# Altium PCB ArmBand-Sensor-Board.PcbDoc
Units mil, origin at the board's own origin, x right, y up, seen from the top; angles counter-clockwise.
Board outline 1181.1 x 984.25 mil, 2 copper layers (Top Layer, Bottom Layer), stack 34 mil thick; 26 components, 22 nets, 118 pads, 68 vias.
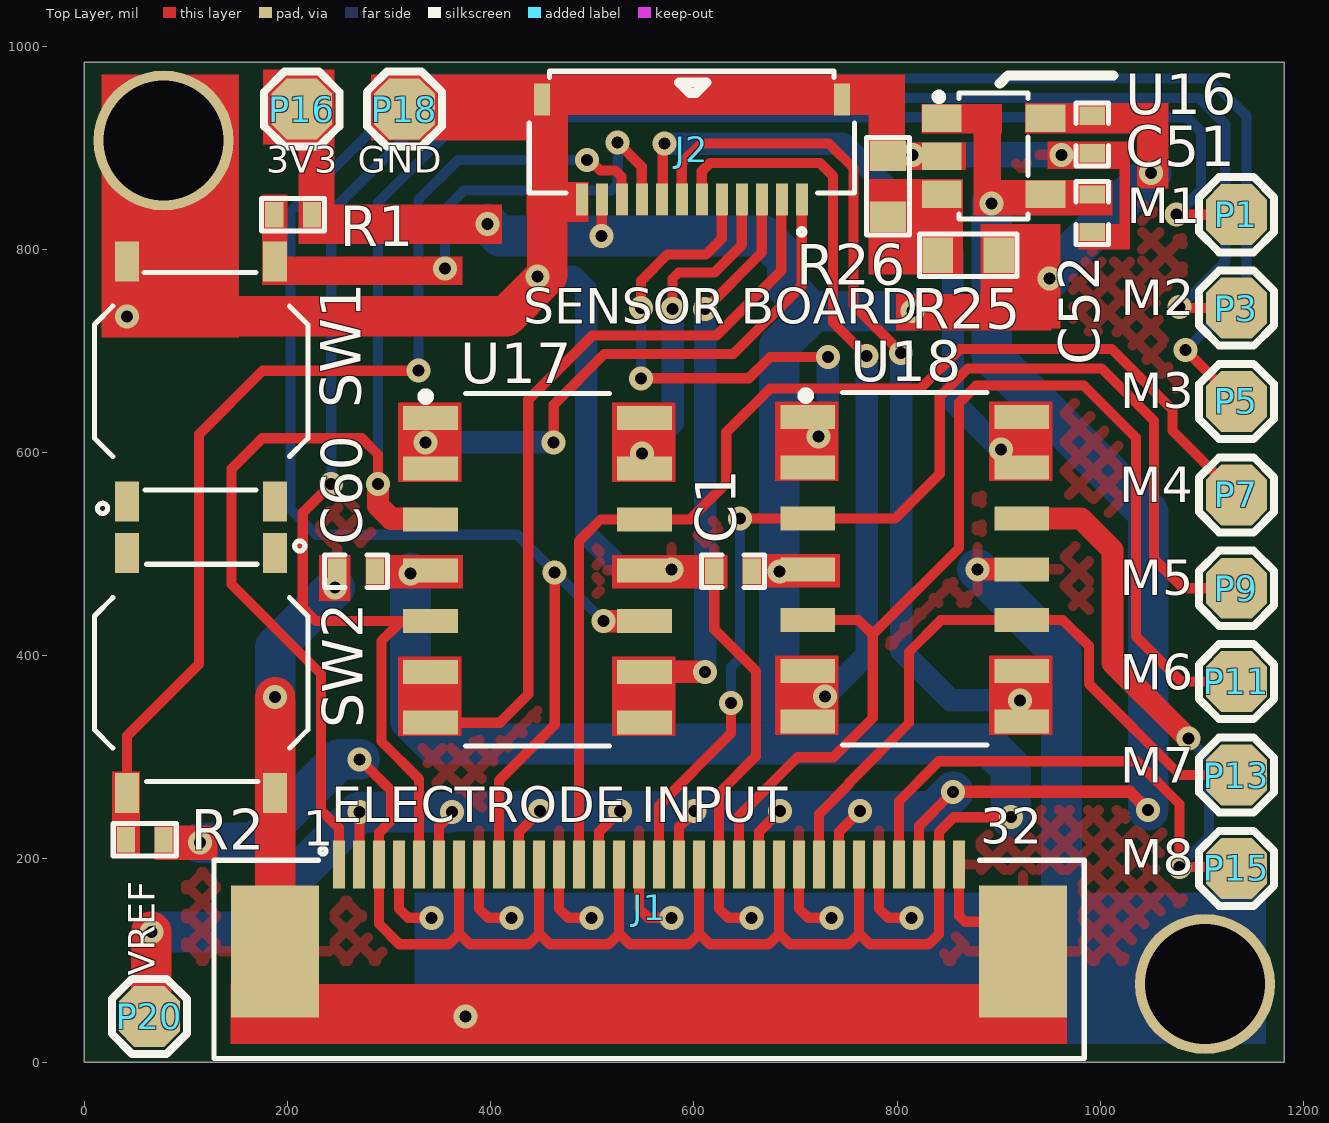
[diagram p0: Top Layer view]
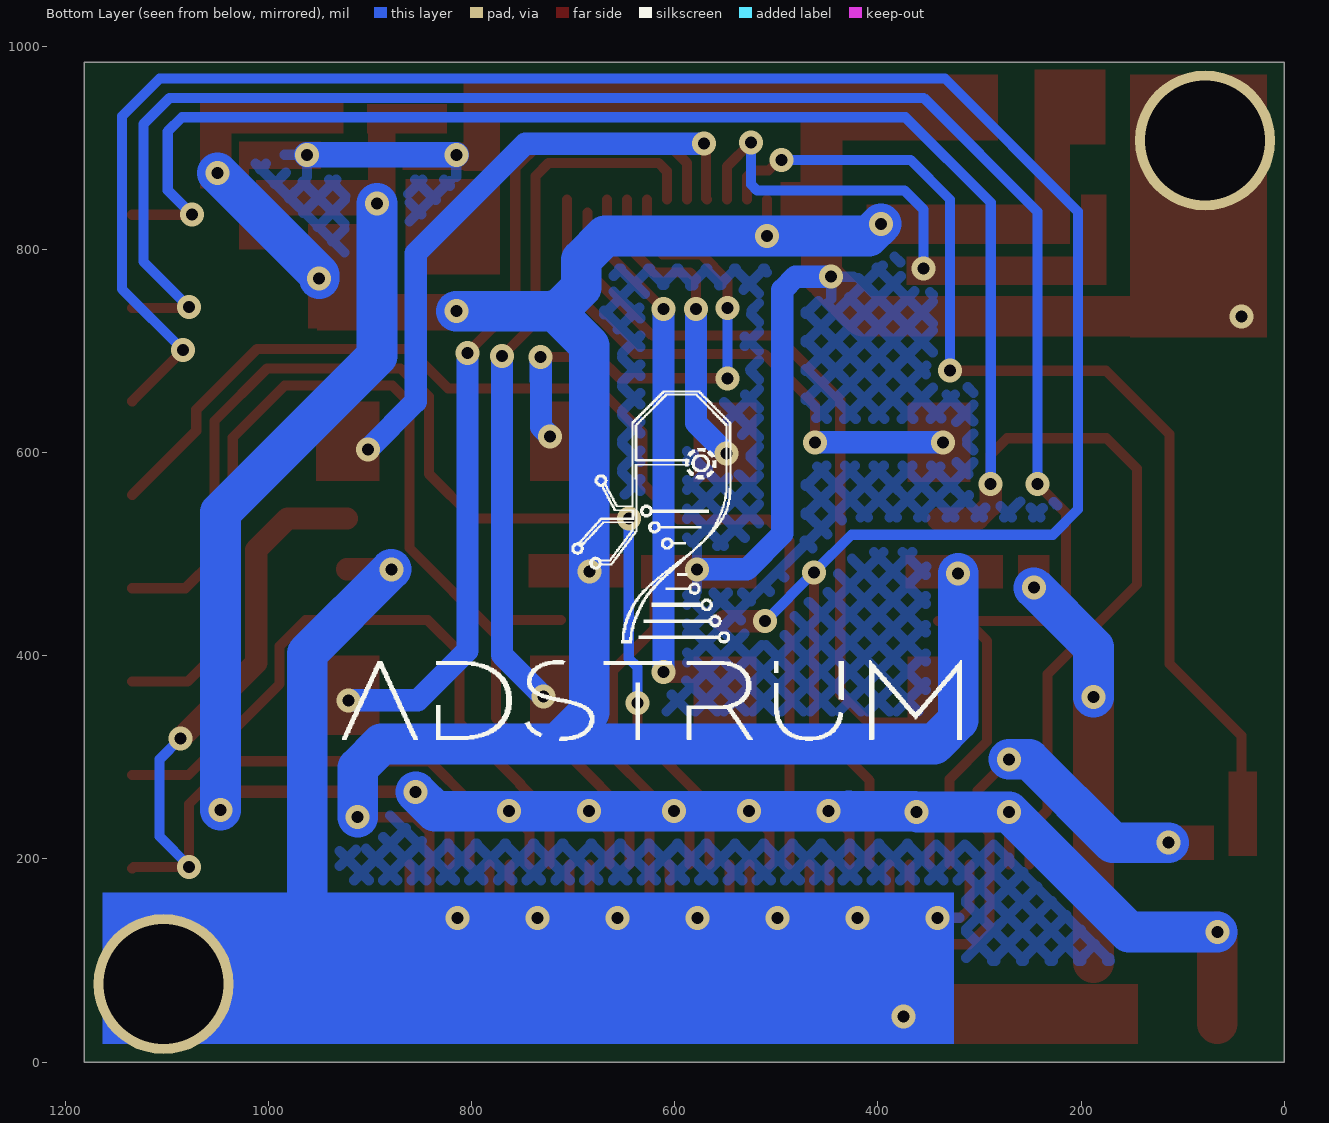
[diagram p1: Bottom Layer view, seen from below]
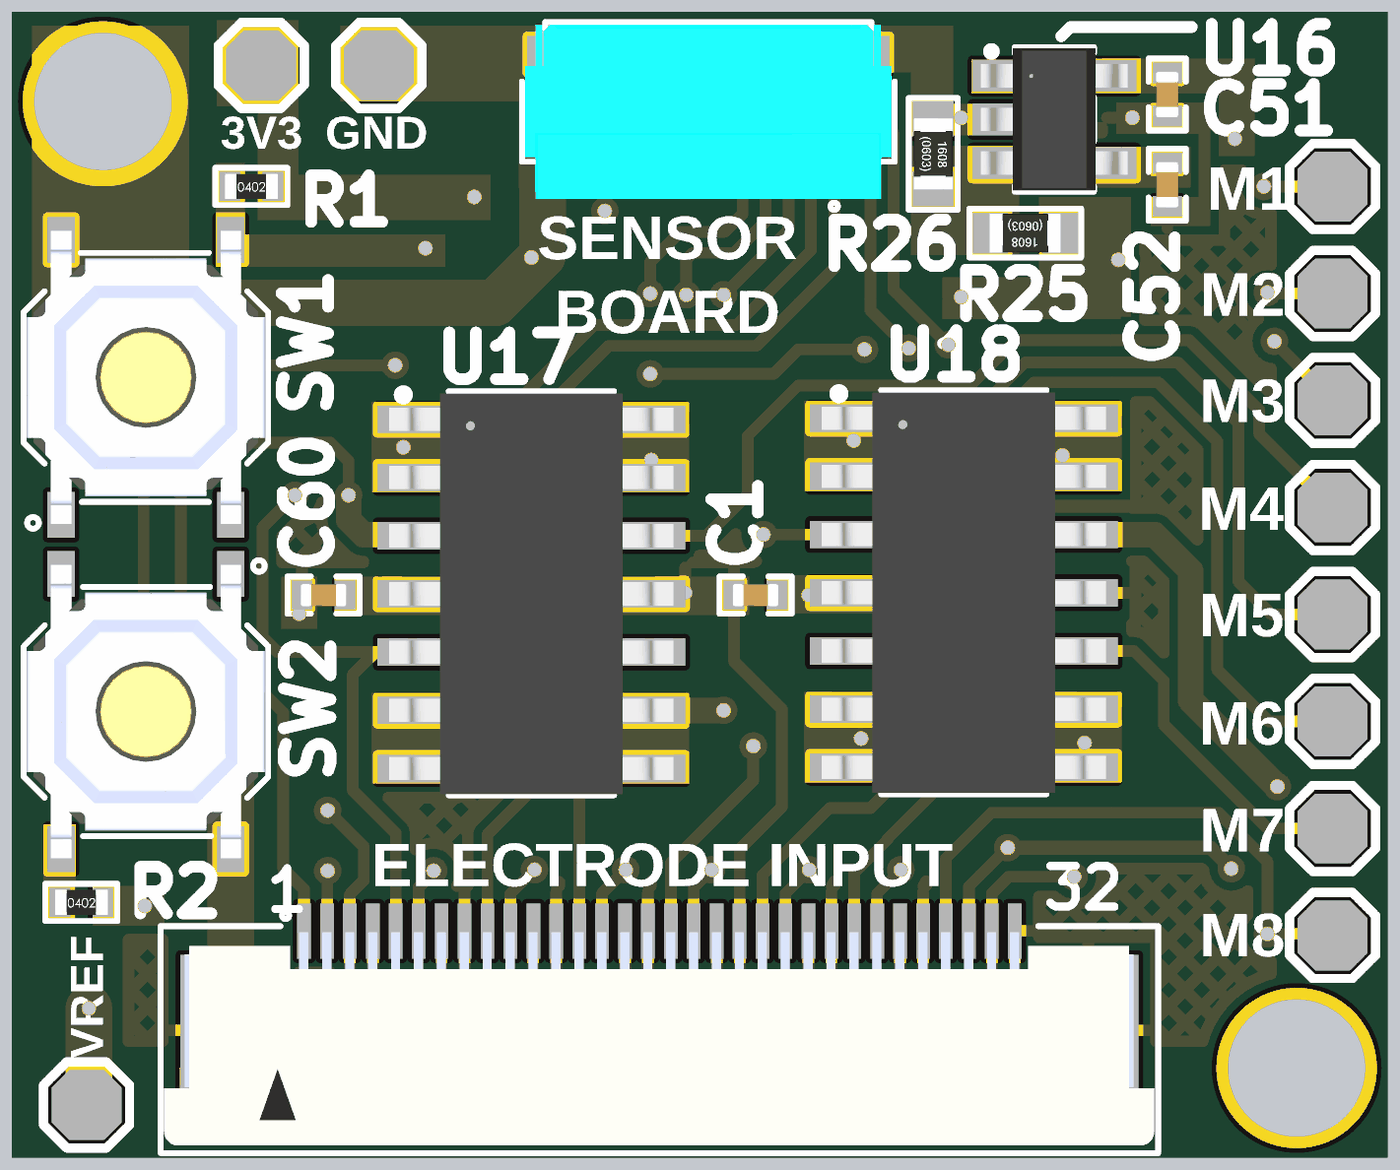
[diagram p2: 3D render of the assembled board from above, using the file's embedded part models]

## Layer stack, top to bottom
Top Solder: solder mask 3, Solder Resist, Dk 3.5
Top Layer: signal copper 9
Dielectric 1: dielectric 16, FR-4, Dk 4.8
Bottom Layer: signal copper 9
Bottom Solder: solder mask 3, Solder Resist, Dk 3.5

## Board outline
0,-0.25 1181.1,-0.25 1181.1,984 0,984

## Design rules (kind name [scope] priority, off if disabled: settings)
Clearance [All] p1: gap=7 ignorepadtopadclearanceinfootprint=FALSE except(0: Arc-Hole Track-Hole SMDPad-Hole THPad-Hole Via-Hole Fill-Hole Poly-Hole Region-Hole Text-Hole; 4: Arc-SMDPad Track-SMDPad SMDPad-SMDPad)
HoleSize [All] p1: absolutevalues=TRUE maxlimit=1000 minlimit=1 maxpercent=80.000 minpercent=20.000
HoleToHoleClearance [All] p1: gap=0 allowstackedmicrovias=TRUE
MinimumSolderMaskSliver [All] p1: minsoldermaskwidth=0
PolygonConnect [All] p1: connectstyle=Relief reliefconductorwidth=10 reliefentries=4 polygonreliefangle="90 Angle" airgapwidth=10
RoutingVias [All] p1: holewidth=11.81 width=23.62 viastyle="Through Hole" minholewidth=11.81 minwidth=23.62 maxholewidth=11.81 maxwidth=23.62
SilkToSilkClearance [All] p1: silktosilkclearance=0
SilkToSolderMaskClearance [IsPad] p1: minsilkscreentomaskgap=0 clearancetoexposedcopper=TRUE
SolderMaskExpansion [All] p1: expansion=4 istentingtop=FALSE
Width [All] p1: maxlimit=40 minlimit=10 preferedwidth=22
25 further rules are at their usual default settings.

## Classes and differential pairs
component class U_Opamp-Sheet2: C1 C51 C52 C60 R25 R26 U16 U17 U18
component class U_Connector-Sheet: J1 J2 P1 P3 P5 P7 P9 P11 P13 P15 P16 P18 P20 R1 R2 SW1 SW2

## Components (designator, comment, footprint, x,y, rotation, side; value= is the part's Value field where it differs from the comment)
C1 "0.1uF" "Cap 0402" 638.5,483 r180 top
C51 "1uF" "Cap 0402" 992,913 r270 top
C52 "1uF" "Cap 0402" 992,835.5 r270 top
C60 "0.1uF" "Cap 0402" 267.5,483 r180 top
J1 "AFC07-S32FCA-00" AFC07-S32FCA-00 555.89,151.72 r0 top
J2 "FH34SRJ-12S-0.5SH(50)" FH34SRJ-12S-0.5SH(50) 597.9,898.21 r180 top locked
P1 "Test Point" "TEST POINT" 1134,834 r0 top
P3 "Test Point" "TEST POINT" 1134,742.09 r0 top
P5 "Test Point" "TEST POINT" 1134,650.17 r0 top
P7 "Test Point" "TEST POINT" 1134,558.26 r0 top
P9 "Test Point" "TEST POINT" 1134,466.34 r0 top
P11 "Test Point" "TEST POINT" 1134,374.43 r0 top
P13 "Test Point" "TEST POINT" 1134,282.51 r0 top
P15 "Test Point" "TEST POINT" 1134,190.6 r0 top
P16 "Test Point" "TEST POINT" 214,938 r90 top
P18 "Test Point" "TEST POINT" 315,938 r180 top
P20 "Test Point" "TEST POINT" 64,45 r0 top
R1 "10K" Res0402 205.5,834 r0 top
R2 "10K" Res0402 59.5,219 r0 top
R25 "64K" Res0603 870,794 r0 top
R26 "64K" Res0603 791,862 r90 top
SW1 "TC-0522C-1.7-260G" TC-0522C-1.7-260G 115,670 r90 top value=-
SW2 "TC-0522C-1.7-260G" TC-0522C-1.7-260G 115,383 r270 top value=-
U16 "TPMCP6021T-E/OT" SOT-23-5 895.02,891.6 r0 top
U17 "LM324DT" SO-14 446,484 r0 top
U18 "LM324DT" SO-14 817.31,485 r0 top

## Footprints (in the part's own frame and the unit in brackets; to place one, negate y for a bottom-side part, rotate by r counter-clockwise, add the part's x,y. Pads: shape width x height; smd on the part's side, far side on the other; paste and mask are expansions set on the pad)
AFC07-S32FCA-00 [mm]
  rect 0.3x1.2 smd: 1(-7.75,1.085) 2(-7.25,1.085) 3(-6.75,1.085) 4(-6.25,1.085) 5(-5.75,1.085) 6(-5.25,1.085) 7(-4.75,1.085) 8(-4.25,1.085) 9(-3.75,1.085) 10(-3.25,1.085) 11(-2.75,1.085) 12(-2.25,1.085) 13(-1.75,1.085) 14(-1.25,1.085) 15(-0.75,1.085) 16(-0.25,1.085) 17(0.25,1.085) 18(0.75,1.085) 19(1.25,1.085) 20(1.75,1.085) 21(2.25,1.085) 22(2.75,1.085) 23(3.25,1.085) 24(3.75,1.085) 25(4.25,1.085) 26(4.75,1.085) 27(5.25,1.085) 28(5.75,1.085) 29(6.25,1.085) 30(6.75,1.085) 31(7.25,1.085) 32(7.75,1.085)
  rect 2.2x3.3 smd: MP1(9.35,-1.085) MP2(-9.35,-1.085)
  silkscreen extent -10.88,-3.76 10.88,1.5, body extent -10.8,-3.59 10.79,1.05, height 2.02
"Cap 0402" [mil]
  rect 18x25 smd mask+2.36: 1(-18.5,0) 2(18.5,0)
  silkscreen extent -31,-16 31,16, body extent -20,-10 20,10, height 19
FH34SRJ-12S-0.5SH(50) [mm]
  rect 0.3x0.8 smd: 1(2.75,1.25) 2(2.25,1.25) 3(1.75,1.25) 4(1.25,1.25) 5(0.75,1.25) 6(0.25,1.25) 7(-0.25,1.25) 8(-0.75,1.25) 9(-1.25,1.25) 10(-1.75,1.25) 11(-2.25,1.25) 12(-2.75,1.25)
  rect 0.4x0.8 smd: MP1(-3.75,-1.25) MP2(3.75,-1.25)
  silkscreen extent -4.06,-1.96 4.06,2.14, body extent -4,-1.9 4,1.9, height 1
Res0402 [mil]
  rect 18x25 smd mask+4: 1(-18.5,0) 2(18.5,0)
  silkscreen extent -32,-17 32,16, body extent -23,-11 23,11, height 16
Res0603 [mil]
  rect 30x35 smd: 1(-30,0) 2(30,0)
  silkscreen extent -48,-21 48,21, body extent -31,-17 31,17, height 18
SO-14 [mm] "0.4 V/us 4 1.3MHz 3V ~ 32V, ±1.5V ~ 16V 1.5mA General Purpose SOIC-14_150mil Operational Amplifier ROHS"
  rect 1.37x0.6 smd: 1(-2.675,3.81) 2(-2.675,2.54) 3(-2.675,1.27) 4(-2.675,0) 5(-2.675,-1.27) 6(-2.675,-2.54) 7(-2.675,-3.81) 8(2.675,-3.81) 9(2.675,-2.54) 10(2.675,-1.27) 11(2.675,0) 12(2.675,1.27) 13(2.675,2.54) 14(2.675,3.81)
  silkscreen extent -2.87,-4.39 1.8,4.42, body extent -3.1,-4.37 3.1,4.37, height 1.76
SOT-23-5 [mm]
  rect 0.99x0.69 smd: 1(-1.295,0.95) 2(-1.295,0) 3(-1.295,-0.95) 4(1.295,-0.95) 5(1.295,0.95)
  silkscreen extent -0.86,-1.57 0.86,1.57, body extent -1.6,-1.55 1.6,1.55, height 1.45
TC-0522C-1.7-260G [mm]
  rect 1x0.6 smd: 1(-3,1.85) 2(3,1.85) 3(3,-1.85) 4(-3,-1.85)
  silkscreen extent -3.3,-2.67 2.72,2.67, body extent -3.2,-2.6 3.2,2.6, height 1.7
"TEST POINT" [mil]
  oct 60x60 smd: 1(0,0)
  silkscreen extent -37,-37 37,37

## Part data
C1 C60: library part GRM155R71H104ME14D, "CAP CER 0.1UF 50V X7R 0402", Capacitance=100nF, Case/Package=0402, Manufacturer=Murata, Max Operating Temperature=125°C, Min Operating Temperature=-55°C, Supplier Part Number 1=490-10701-1-ND, Tolerance=20%, Voltage Rating=50V, ComponentLink1Description=http://search.murata.co.jp/Ceramy/image/img/A01X/G101/ENG/GRM155R71H104ME14-01.pdf?src-supplier=Digi-Key, ComponentLink1URL=http://search.murata.co.jp/Ceramy/image/img/A01X/G101/ENG/GRM155R71H104ME14-01.pdf?src-supplier=Digi-Key, ComponentLink2Description=http://psearch.en.murata.com/capacitor/product/GRM155R71H104ME14%23.pdf?src-supplier=Avnet, ComponentLink2URL=http://psearch.en.murata.com/capacitor/product/GRM155R71H104ME14%23.pdf?src-supplier=Avnet, ComponentLink3Description=http://components.arrow.com/part/dataview/0323_07177683?src-supplier=Arrow+Europe, ComponentLink3URL=http://components.arrow.com/part/dataview/0323_07177683?src-supplier=Arrow+Europe, ComponentLink4Description=http://www.mouser.com/ds/2/281/c02e-2905.pdf?src-supplier=Mouser, ComponentLink4URL=http://www.mouser.com/ds/2/281/c02e-2905.pdf?src-supplier=Mouser, Length=0.039inch, Manufacturer Part Number=GRM155R71H104ME14D, Mount="Surface Mount", Packaging="Cut Tape", Pricing 1="1=0.1, 10=0.038, 100=0.0168, 500=0.01198, 1000=0.00941, 2500=0.00855, 5000=0.00787 (USD)", Stock 1=439844, Supplier 1=Digi-Key, Thickness=0.022inch, Width=0.02inch
C51 C52: library part CC0402KRX5R7BB105, "CAP CER 1UF 16V X5R 0402", Case Code (Imperial)=0402, Case Code (Metric)=1005, Dielectric=X5R, Manufacturer=Yageo, Max Operating Temperature=85°C, Min Operating Temperature=-55°C, Supplier Part Number 1=311-1691-6-ND, Tolerance=10%, Voltage Rating=16V, Capacitance=1uF, Case/Package=0402, ComponentLink1Description=http://www.yageo.com/documents/recent/UPY-GPHC_X5R_4V-to-50V_12.pdf?src-supplier=Avnet+Europe, ComponentLink1URL=http://www.yageo.com/documents/recent/UPY-GPHC_X5R_4V-to-50V_12.pdf?src-supplier=Avnet+Europe, Composition=Ceramic, Depth=0.5mm, Halogen Free="Halogen Free", Height=0.5mm, Lead Free="Lead Free", Length=1mm, Manufacturer Part Number=CC0402KRX5R7BB105, Mount="Surface Mount", Packaging="Tape and Reel", Pricing 1="1=0.36, 10=0.252, 100=0.1512, 500=0.1134, 1000=0.09576, 2500=0.09072, 5000=0.08568 (USD)", Radiation Hardening=No, Stock 1=1405667, Supplier 1=Digi-Key, Termination=SMD/SMT, Thickness=0.022inch, Voltage Rating (DC)=16V, Weight=2.3E-05oz, Width=0.02inch
J1: "Slide Lock 32 Bottom Contact Surface Mount 0.5mm SMD,P=0.5mm FFC/FPC Connectors ROHS", Manufacturer=JUSHUO, ComponentLink1Description=LCSC, ComponentLink1URL=https://lcsc.com/product-detail/FFC-FPC-Connectors_JUSHUO-AFC07-S32FCA-00_C262570.html, Manufacturer Part Number=AFC07-S32FCA-00
J2: "CONN FPC/FFC 12POS .5MM", Manufacturer=Hirose, Supplier Part Number 1=FH34SRJ-12S-0.5SH(50)-ND, Category="FFC / FPC", ComponentLink1Description=https://www.hirose.com/product/en/download_file/key_name/FH34SRJ/category/Catalog/doc_file_id/31646/?file_category_id=4&item_id=27&is_series=1&src-supplier=Digi-Key, ComponentLink1URL=https://www.hirose.com/product/en/download_file/key_name/FH34SRJ/category/Catalog/doc_file_id/31646/?file_category_id=4&item_id=27&is_series=1&src-supplier=Digi-Key, Manufacturer Part Number=FH34SRJ-12S-0.5SH(50), Pricing 1="5000=0.47775 (USD)", RoHS=Yes, Supplier 1=Digi-Key
P1 P3 P5 P7 P9 P11 P13 P15 P16 P18 P20: library part "TEST POINT", "Test Point ON"
R1 R2: library part RC0402FR-0710KL, "RES SMD 10K OHM 1% 1/16W 0402", Case Code (Imperial)=0402, Case Code (Metric)=1005, Manufacturer=Yageo, Max Operating Temperature=155°C, Min Operating Temperature=-55°C, Power Rating=62.5mW, Resistance=10kR, Supplier Part Number 1=311-10.0KLRDKR-ND, Temperature Coefficient=100ppm/°C, Tolerance=1%, Voltage Rating=50V, Case/Package=0402, ComponentLink1Description=http://www.farnell.com/datasheets/2167052.pdf?src-supplier=Element14, ComponentLink1URL=http://www.farnell.com/datasheets/2167052.pdf?src-supplier=Element14, ComponentLink2Description=http://www.farnell.com/datasheets/1686128.pdf?src-supplier=Element14, ComponentLink2URL=http://www.farnell.com/datasheets/1686128.pdf?src-supplier=Element14, ComponentLink3Description=http://www.farnell.com/datasheets/1784430.pdf?src-supplier=Element14, ComponentLink3URL=http://www.farnell.com/datasheets/1784430.pdf?src-supplier=Element14, ComponentLink4Description=http://www.yageo.com/documents/recent/PYu-RC_Group_51_RoHS_L_9.pdf?src-supplier=Mouser, ComponentLink4URL=http://www.yageo.com/documents/recent/PYu-RC_Group_51_RoHS_L_9.pdf?src-supplier=Mouser, Composition="Thick Film", Depth=0.5mm, Height=0.32mm, Lead Free="Lead Free", Lead Pitch=0.2mm, Length=1mm, Manufacturer Part Number=RC0402FR-0710KL, Military Standard=Not, Number of Pins=2, Number of Terminations=2, Packaging="Tape and Reel", Pricing 1="1=0.1, 10=0.016, 100=0.0064, 1000=0.00289, 2500=0.00251, 5000=0.00207 (USD)", REACH SVHC="No SVHC", Stock 1=60122563, Supplier 1=Digi-Key, Termination=SMD/SMT, Voltage Rating (DC)=50V, Width=0.5mm, Working Voltage=50V
R25 R26: library part ARG03DTC6402N, "1/10W Thin Film Resistor 75V ±0.5% ±25ppm/℃ -55℃~+155℃ 64kΩ 0603 Chip Resistor - Surface Mount ROHS", Manufacturer="iking Tech", Package=0603, Manufacture Part num=ARG03DTC6402N
SW1 SW2: "No Gull Wing 50mA 100MΩ 80000 260gf@±50gf 12V -25℃~+85℃ 1.7mm Golden Round Button Brick nogging SPST SMD Tactile Switches ROHS", Manufacturer=HCTL, ComponentLink1Description=LCSC, ComponentLink1URL=https://www.lcsc.com/product-detail/Tactile-Switches_HCTL-TC-0522C-1-7-260G_C2845290.html, Manufacturer Part Number=TC-0522C-1.7-260G
U16: "SOT-23-5 Operational Amplifier ROHS", Manufacturer="TECH PUBLIC", Manufacturer Part Number=TPMCP6021T-E/OT
U17 U18: "IC OPAMP GP 1.3MHZ 14SO", Case/Package=SO, Dual Supply Voltage=12V, Input Bias Current=150nA, Input Offset Voltage (Vos)=7mV, Input Voltage Noise Density="40nV/sqrt Hz", Manufacturer=STMicroelectronics, Max Dual Supply Voltage=15V, Max Operating Temperature=70°C, Max Power Dissipation=400mW, Max Supply Voltage=30V, Min Dual Supply Voltage=1.5V, Min Operating Temperature=0°C, Min Supply Voltage=3V, Nominal Supply Current=1.2mA, Output Current=40mA, Package Quantity=2500, Voltage Gain=100dB, Bandwidth=1.3MHz, Category="Amplifiers - Op Amps, Buffer, Instrumentation", Common Mode Rejection Ratio=70dB, ComponentLink1Description=https://datasheet.ciiva.com/4758/cd00000457-103203-4758032.pdf?src-supplier=Mouser, ComponentLink1URL=https://datasheet.ciiva.com/4758/cd00000457-103203-4758032.pdf?src-supplier=Mouser, ComponentLink2Description=https://datasheet.ciiva.com/8008/1834360-8008827.pdf?src-supplier=Element14, ComponentLink2URL=https://datasheet.ciiva.com/8008/1834360-8008827.pdf?src-supplier=Element14, ComponentLink3Description=https://datasheet.ciiva.com/8008/1834360-8008490.pdf?src-supplier=Element14, ComponentLink3URL=https://datasheet.ciiva.com/8008/1834360-8008490.pdf?src-supplier=Element14, ComponentLink4Description=https://datasheet.ciiva.com/28630/1834360-28630538.pdf?src-supplier=Element14, ComponentLink4URL=https://datasheet.ciiva.com/28630/1834360-28630538.pdf?src-supplier=Element14, ComponentLink5Description=https://datasheet.ciiva.com/1795/cd00000457-1795560.pdf?src-supplier=Digi-Key, ComponentLink5URL=https://datasheet.ciiva.com/1795/cd00000457-1795560.pdf?src-supplier=Digi-Key, ComponentLink6Description=https://datasheet.ciiva.com/1795/cd00000457-1795559.pdf?src-supplier=Digi-Key, ComponentLink6URL=https://datasheet.ciiva.com/1795/cd00000457-1795559.pdf?src-supplier=Digi-Key, ComponentLink7Description=https://datasheet.ciiva.com/1795/cd00000457-1795561.pdf?src-supplier=Digi-Key, ComponentLink7URL=https://datasheet.ciiva.com/1795/cd00000457-1795561.pdf?src-supplier=Digi-Key, ComponentLink8Description=https://datasheet.ciiva.com/16375/cd00000457-16375528.pdf?src-supplier=Future+Electronics, ComponentLink8URL=https://datasheet.ciiva.com/16375/cd00000457-16375528.pdf?src-supplier=Future+Electronics, Contact Plating=Tin,Matte, Gain Bandwidth Product=1.3MHz, Height=1.65mm, Lead Free="Lead Free", Length=8.75mm, Manufacturer Part Number=LM324DT, Mount="Surface Mount", Number of Amplifiers=4, Number of Channels=4, Number of Circuits=4, Number of Elements=4, Number of Pins=14, Operating Supply Current=1.2mA, Operating Supply Voltage=15V, Output Current per Channel=40mA, Packaging="Cut Tape", Pricing 1="2500=0.18900 (USD)", Radiation Hardening=No, REACH SVHC="No SVHC", RoHS=Yes, RoHS Compliant=Yes, Series=LM324, Slew Rate=0.4V/µs, Stock 1=287500, Supplier 1="Arrow Electronics", Supplier Part Number 1=LM324DT, Supply Type=Single,Dual, Technology=BIPOLAR, Unity Gain Bandwidth Product=1.3MHz, Weight=0.009143oz, Width=4mm

## Free pads (board coordinates)
  round 137.8 hole 118.11: MH1(78,907) MH2(1103.1,76.75)

## Via types
v1: diameter 23.62, hole 11.81, Top Layer to Bottom Layer, tented both sides, 68 vias

## Nets (pads, with @x,y where several pads share a name; then routed paths per layer and width w, separated by ;. In a path a pad name is that pad's centre, name@x,y a point inside that pad or via, vN(x,y) a via of type N, cw(c..) or ccw(c..) an arc to the next point about the centre after c; other vN are vias at no path point)
GND: C1.2 C51.2 C52.2 C60.2 J1.4 J1.8 J1.12 J1.16 J1.20 J1.24 J1.28 J1.32 J1.MP1 J1.MP2 J2.1 J2.MP1 J2.MP2 P18.1 pad.MH1 pad.MH2 R26.2 SW1.2 SW2.2 U16.2 U17.11 U18.11 | length 2894.8
  Top Layer w10: J1.4 309.83,150.73 318.56,142 v1(341.56,142) ; J1.8 388.57,150.73 397.3,142 v1(420.3,142) ; J1.12 467.31,150.73 476.04,142 v1(499.04,142) ; J1.16 546.05,150.73 554.78,142 v1(577.78,142) ; C1.2 620,426 661,385 661,301 624.79,264.79 J1.20 624.79,150.73 633.52,142 v1(656.52,142) ; J1.24 703.53,150.73 712.26,142 v1(735.26,142) ; J1.28 782.27,150.73 791,142 v1(814,142) ; J1.32 861.01,143.99 866.87,138.13 894.87,138.13 J1.MP1
  Top Layer w22: v1(879,485) U18.11
  Top Layer w40: v1(42,734) 415,734 v1@450,769 ; J1.MP2@187.83,98 SW2.2 v1(187.83,359.17) ; v1@455.5,774.5 455.5,888
  Bottom Layer w22: v1(446,773) 481.11,773 494,760.11 494,520 529,485 v1(578,485)
  Bottom Layer w25: v1(815,893) v1(962,893)
  Bottom Layer w40: v1(187.83,359.17) 187.83,408.33 v1(246.5,467) ; v1(879,485) 961.81,402.19 961.81,138.19
  other v1: 375,45
Measure1: J1.1 P1.1 U17.3 | length 1982.9
  Top Layer w10: J1.1 250.77,230.23 233,248 233,382 145,470 145,584 175,614 273,614 289,598 v1(289,568.75) ; v1(1075,834) P1.1
  Top Layer w22: v1(289,568.75) 289,547.7 301.89,534.81 339.87,534.81 U17.3
  Bottom Layer w10: v1(289,568.75) 289,846 373,930 1085,930 1099,916 1099,858 v1(1075,834)
Measure2: J1.5 P3.1 U17.5 | length 1986.4
  Top Layer w10: v1(243,568.75) 215,540.75 215,447 228,434 U17.5 ; 311,433 292.57,414.57 292.57,315.43 329.51,278.49 J1.5 ; v1(1078,743) 1078.91,742.09 P3.1
  Bottom Layer w10: v1(243,568.75) 243,837 355,949 1097,949 1123,923 1123,788 v1(1078,743)
Measure3: J1.9 P5.1 U17.10 | length 2334.3
  Top Layer w10: J1.9 408.25,277.25 463,332 v1(463,482) ; v1(1084,701) 1084,700.59 1134,650.59 P5.1
  Top Layer w22: v1(511,434) U17.10
  Bottom Layer w10: v1(511,434) v1(463,482) 426,519 228,519 203,544 203,837 334,968 1107,968 1144,931 1144,760.79 v1@1084,700.79
Measure4: J1.13 P7.1 U17.12 | length 1144.8
  Top Layer w10: J1.13 486.99,242.01 486.99,512.99 508,534 U17.12 596,534 631.82,569.82 631.82,619.82 675,663 823,663 862,702 1011,702 1071,642 1071,621.26 P7.1
Measure5: J1.17 P9.1 U18.3 | length 1137.4
  Top Layer w10: J1.17 565.73,252.73 636.53,323.53 v1(636.53,353.28) ; v1(645.19,535) U18.3 798,535 842,579 842,655 869.8,682.8 1001.2,682.8 1053,631 1053,495 1081.66,466.34 P9.1
  Bottom Layer w10: v1(636.53,353.28) 636.53,388.53 645.19,397.19 v1(645.19,535)
Measure6: J1.21 P11.1 U18.5 | length 1150.1
  Top Layer w10: J1.21 644.47,242.47 702,300 737.29,300 776,338.71 776,421 ; U18.5 762,435 776,421 ; P11.1 1079.57,374.43 1035,419 1035,614.8 984,665.8 877.8,665.8 861,649 861,506 776,421
Measure7: J1.25 P13.1 U18.10 | length 666.2
  Top Layer w10: J1.25 723.21,244.21 752,273 752,274 811.66,333.66 811.66,403.66 843,435 U18.10 963.33,435 989,409.33 989,372 1078.49,282.51 P13.1
Measure8: J1.29 P15.1 U18.12 | length 956.3
  Top Layer w10: J1.29 801.95,256.95 841,296 1036,296 1078,254 v1(1078,192) 1132.6,192 P15.1
  Top Layer w22: U18.12 981,535 1012,504 1012,393 v1(1086.56,318.44)
  Bottom Layer w10: v1(1078,192) 1078,193 1107,222 1107,298 v1(1086.56,318.44)
SENSOR1: J2.12 U17.1 U17.2 | length 540.5
  Top Layer w10: v1(462,610) 462,647 512,697 639,697 706.17,764.17 J2.12
  Bottom Layer w22: v1(336,610) v1(462,610)
SENSOR2: J2.11 U17.6 U17.7 | length 756.5
  Top Layer w10: U17.7 409,334 437,362 437,652 500,715 622,715 686,779 J2.11@686,836
SENSOR3: J2.10 U17.8 U17.9 | length 541.4
  Top Layer w10: v1(611,741) 666.8,796.8 J2.10
  Top Layer w22: U17.9 v1@608,384
  Bottom Layer w22: v1@611,387.44 v1(611,741)
  other v1: 611,384
SENSOR4: J2.9 U17.13 U17.14 | length 310.8
  Top Layer w10: v1(579,741) 579,771.14 584.86,777 620,777 647.11,804.11 J2.9
  Bottom Layer w22: v1@549.31,599.31 579,629 v1(579,741)
  other v1: 549,599
SENSOR5: J2.8 U18.1 U18.2 | length 505.3
  Top Layer w10: v1(548,673) 654,673 675,694 v1(732,694) ; v1(548,742) 548,769 574,795 612,795 627.43,810.43 J2.8
  Bottom Layer w10: v1(548,673) v1(548,742)
  Bottom Layer w22: v1(722.81,615.81) 722.81,616.25 731.62,625.06 731.62,671.29 731.69,671.36 731.69,693.25 v1@732,693.25
SENSOR6: J2.7 U18.6 U18.7 | length 700.6
  Top Layer w10: J2.7 607.74,876.74 616,885 724,885 737,872 737,728 v1(770,695)
  Bottom Layer w22: v1(729.06,359.81) 770,400.75 v1@770,687
SENSOR7: J2.6 U18.8 U18.9 | length 846.6
  Top Layer w10: J2.6 588.06,885.06 607,904 733,904 757,880 757,745 v1(804,698)
  Bottom Layer w22: v1@804,690 804,405 853,356 v1(921,356)
SENSOR8: J2.5 U18.13 U18.14 | length 597.3
  Top Layer w10: J2.5 569.28,849.91 569.28,902.28 v1(571,904)
  Bottom Layer w22: v1(571,904) 747,904 855,796 855,650 v1(902,603)
SW1: J2.4 R1.1 SW1.3 | length 345.2
  Top Layer w10: v1(525,905) 548.69,881.31 J2.4
  Bottom Layer w10: v1(355,781) 355,839 374,858 519.14,858 525,863.86 v1(525,905)
SW2: J2.3 R2.1 SW2.3 | length 1038.3
  Top Layer w10: SW2.3 42.17,321.17 113,392 113,618 175.44,680.44 v1(329,680.44) ; v1(495,888) 497.12,888 507.67,877.46 522.87,877.46 528.73,871.6 528.73,849.27 J2.3
  Bottom Layer w10: v1(329,680.44) 329,849 368,888 v1(495,888)
VCC_3V3: C1.1 C51.1 C60.1 J1.3 J1.7 J1.11 J1.15 J1.19 J1.23 J1.27 J1.31 J2.2 P16.1 R1.2 R2.2 R25.2 U16.5 U17.4 U18.4 | length 3481.5
  Top Layer w10: v1(271,298) 302,267 302,237.72 290.14,225.86 J1.3 290.14,135.86 310,116 358.56,116 368.88,126.32 ; J1.7 368.88,126.32 ; 379.2,116 368.88,126.32 ; 380.3,116 437.3,116 447.62,126.32 ; J1.11 447.62,126.32 ; 457.94,116 447.62,126.32 ; 459.04,116 516.04,116 526.36,126.32 ; v1(509,813) 509.32,813.32 J2.2 ; J1.15 526.36,126.32 ; 536.69,116 526.36,126.32 ; 537.78,116 594.78,116 605.1,126.32 ; J1.19 605.1,126.32 ; 615.43,116 605.1,126.32 ; 616.52,116 673.52,116 683.84,126.32 ; J1.23 683.84,126.32 ; 694.17,116 683.84,126.32 ; 695.26,116 752.26,116 762.58,126.32 ; J1.27 762.58,126.32 ; 772.91,116 762.58,126.32 ; 774,116 831,116 841.32,126.32 841.32,226.54 855.79,241 v1(912,241)
  Top Layer w40: P16.1 214,934.72 P16.1@225,923.72
  Bottom Layer w40: v1(114,216) 169,216 251,298 v1(271,298) ; v1(321,481) 321,336.43 344.43,313 888.57,313 912,289.57 v1(912,241) ; v1(397,825) 409,813 668.57,813 692,789.57 692,762.43 715.43,739 v1(815,739) ; 707.43,321 684,344.43 v1(684,483) 684,705 719,740 ; v1(950,771) 950,775 v1(1050,875)
VREF: C52.1 J1.2 J1.6 J1.10 J1.14 J1.18 J1.22 J1.26 J1.30 P20.1 U16.1 U16.4 | length 2288.1
  Top Layer w10: J1.2 270.73,194.7 270.73,245.92 v1(271,246.19) ; J1.6 349.2,232.2 v1@362,245 ; J1.10 427.94,226.4 v1(448.62,247.08) ; J1.14 506.68,226.68 v1(527,247) ; J1.18 585.42,231.68 v1(600.74,247) ; J1.22 664.16,226.68 v1(684.48,247) ; J1.26 742.9,226.68 v1(763.22,247) ; J1.30 821.64,232.64 851.55,262.55 v1@854.49,262.55 ; v1(855,266) v1@856,267
  Top Layer w12: v1@856,267 857,266 1029,266 v1(1047,248)
  Top Layer w40: P20.1@66,38 v1(66,128)
  Bottom Layer w40: v1(66,128) 152.81,128 v1(271,246.19) v1@360.81,246.19 ; v1@364,247 428.53,247 428.62,247.08 ; 428.62,247 v1(527,247) v1(684.48,247) v1(763.22,247) 836,247 v1(855,266) ; v1(893,845) 893,695 1047,541 v1(1047,248)
  other v1: 362,246.19
VS+1: R25.1 R26.1 U16.3
pads on no net: SW1.1 SW1.4 SW2.1 SW2.4

## Polygon pours and split planes (outlines as drawn)
GND on Bottom Layer "GND_L02_P001" (hatched 45Degree grid 20 track 10, remove dead copper, pour order 1): 100,99.75 1081.1,99.75 1081.1,884.25 100,884.25
GND on Top Layer "GND_L01_P000" (hatched 45Degree grid 20 track 10, remove dead copper, pour order 0): 100,99.75 1081.1,99.75 1081.1,884.25 100,884.25

## Other copper
Top Layer:
  rectangle net GND: 456,932 808,972
  rectangle net GND: 282,907 459,972
  rectangle net GND: 454,827 496,866
  rectangle net SW2: 27,203 55,286
  rectangle net VCC_3V3: 69,199 131,233
  rectangle net GND: 231,454 262,499
  rectangle net VCC_3V3: 176,903 246,977
  rectangle net VCC_3V3: 211,805 246,911
  rectangle net SW1: 175,765 372,793
  rectangle net VCC_3V3: 276.69,466 372.69,499
  region net SENSOR2: 371,399 308.69,399 308.69,321 371,321
  region net SENSOR1: 371,649 308.69,649 308.69,571 371,571
  rectangle net VCC_3V3: 211,805 411,844
  rectangle net GND: 435,833 476,972
  region net SENSOR4: 581.63,649 519.31,649 519.31,571 581.63,571
  region net SENSOR5: 742.31,650 680,650 680,572 742.31,572
  rectangle net GND: 772,877 808,967
  region net SENSOR8: 952.94,650 890.63,650 890.63,572 952.94,572
  region net SENSOR7: 952.94,400 890.63,400 890.63,322 952.94,322
  rectangle net VCC_3V3: 1036,860 1067,935
  rectangle net GND: 1019,800 1029,893
  rectangle net GND: 978,800 1029,825
  rectangle net VS+1: 772,775 865,869
  rectangle net GND: 774,878 868,905
  rectangle net VREF: 824,914 903,943
  rectangle net VREF: 875,845 902,925
  rectangle net GND: 144,18 967,77
  rectangle net VCC_3V3: 882,722 961,825
  rectangle net GND: 17,713 152,972
  rectangle net VREF: 963,839 1012,868.2
  rectangle net VCC_3V3: 926,914 1067,944
  region net GND: 1029,906 948,906 948,879 1029,879
  rectangle net VREF: 875,833 1012,868.2
  rectangle net VCC_3V3: 648,467 744,500
  region net SENSOR6: 742.31,400 680,400 680,322 742.31,322
  rectangle net VCC_3V3: 799,720 952,756
  region net SENSOR3: 581.63,399 519.31,399 519.31,321 581.63,321
  region net GND: 633,499 519.31,499 519.31,466 633,466
  rectangle net SW1: 175,765 200,854
Bottom Layer:
  rectangle net GND: 325,18 1163,167

## Silkscreen, mask and mechanical layers (free items; w line width, h text height)
Top Overlay:
  circle w7.87: c841,950 r3.16
  lines w10: 901,963 909,971 1013,971 ; 585.25,964.25 595.75,953.75 601.75,953.75 612.25,964.25 585.25,964.25
  text "3V3" at 179,866.54 h45
  text "GND" at 269,866.54 h45
  text "M1" at 1026,814 h60
  text "M2" at 1020.03,723 h60
  text "SENSOR BOARD" at 432,715 h60
  text "M3" at 1019.62,631.72 h60
  text "M4" at 1018.57,539 h60
  text "M5" at 1018.98,447.72 h60
  text "M6" at 1019.27,354.72 h60
  text "M7" at 1019.74,263 h60
  text "ELECTRODE INPUT" at 243,224 h60
  text "32" at 882,215 h35
  text "1" at 215,213 h35
  text "M8" at 1019.74,172.72 h60
  text "VREF" at 78,85 h45 r90
Bottom Overlay:
  drawing of 2568 lines, arcs and shapes, not listed
Mechanical 2:
  the board outline again, w10
Drill Drawing:
  drawing of 355 lines, arcs and shapes, not listed
  text "Layer" at 1990.58,4172 h60
  text "Name" at 2400.49,4172 h60
  text "Material" at 3330.23,4172 h60
  text "Thickness" at 4190,4172 h60
  text "Constant" at 4839.84,4172 h60
  text "Board Layer Stack" at 5409.7,4172 h60
  text "Top Overlay" at 2400.49,4052 h60
  text "Top Solder" at 2400.49,3932 h60
  text "Solder Resist" at 3330.23,3932 h60
  text "3.00mil" at 4190,3932 h60
  text "3.5" at 4839.84,3932 h60
  text "1" at 1990.58,3812 h60
  text "Top Layer" at 2400.49,3812 h60
  text "9.00mil" at 4190,3812 h60
  text "Dielectric 1" at 2400.49,3692 h60
  text "FR-4" at 3330.23,3692 h60
  text "16.00mil" at 4190,3692 h60
  text "4.8" at 4839.84,3692 h60
  text "2" at 1990.58,3572 h60
  text "Bottom Layer" at 2400.49,3572 h60
  text "9.00mil" at 4190,3572 h60
  text "Bottom Solder" at 2400.49,3452 h60
  text "Solder Resist" at 3330.23,3452 h60
  text "3.00mil" at 4190,3452 h60
  text "3.5" at 4839.84,3452 h60
  text "Bottom Overlay" at 2400.49,3332 h60
  text "Symbol" at 1861.5,-852.5 h72
  text "Count" at 2367.38,-852.5 h72
  text "Hole Size" at 2907.24,-852.5 h72
  text "Plated" at 4026.91,-852.5 h72
  text "Hole Type" at 4532.79,-852.5 h72
  text "Drill Layer Pair" at 5266.59,-852.5 h72
  text "Via/Pad" at 6766.14,-852.5 h72
  text "Pad Shape" at 7355.99,-852.5 h72
  text "Template" at 8101.78,-852.5 h72
  text "Description" at 8851.58,-852.5 h72
  text "Hole Tolerance (+)" at 9705.34,-852.5 h72
  text "Hole Tolerance (-)" at 11038.95,-852.5 h72
  text "2" at 2367.38,-1002.5 h60
  text "118.11mil (3.000mm)" at 2907.24,-1002.5 h60
  text "PTH" at 4026.91,-1002.5 h60
  text "Round" at 4532.79,-1002.5 h60
  text "Top Layer - Bottom Layer" at 5266.59,-1002.5 h60
  text "Pad" at 6766.14,-1002.5 h60
  text "Rounded" at 7355.99,-1002.5 h60
  text "c350h300" at 8101.78,-1002.5 h60
  text "68" at 2367.38,-1152.5 h60
  text "11.81mil (0.300mm)" at 2907.24,-1152.5 h60
  text "PTH" at 4026.91,-1152.5 h60
  text "Round" at 4532.79,-1152.5 h60
  text "Top Layer - Bottom Layer" at 5266.59,-1152.5 h60
  text "Via" at 6766.14,-1152.5 h60
  text "Rounded" at 7355.99,-1152.5 h60
  text "v60h30m0mx0" at 8101.78,-1152.5 h60
  text "70 Total" at 2367.38,-1302.5 h60

## Dimensions
0,0 to 1181.1,-0.25 on Mechanical 1
0,984.25 to 0,0 on Mechanical 1